# Altium PCB Electrode_35x25_4x5_D2_GUARD.PcbDoc
Units mm, origin at the board's own origin, x right, y up, seen from the top; angles counter-clockwise.
Board outline 35 x 25 mm, 2 copper layers (Top Layer, Bottom Layer); 7 components, 6 nets, 36 pads, 8 vias.
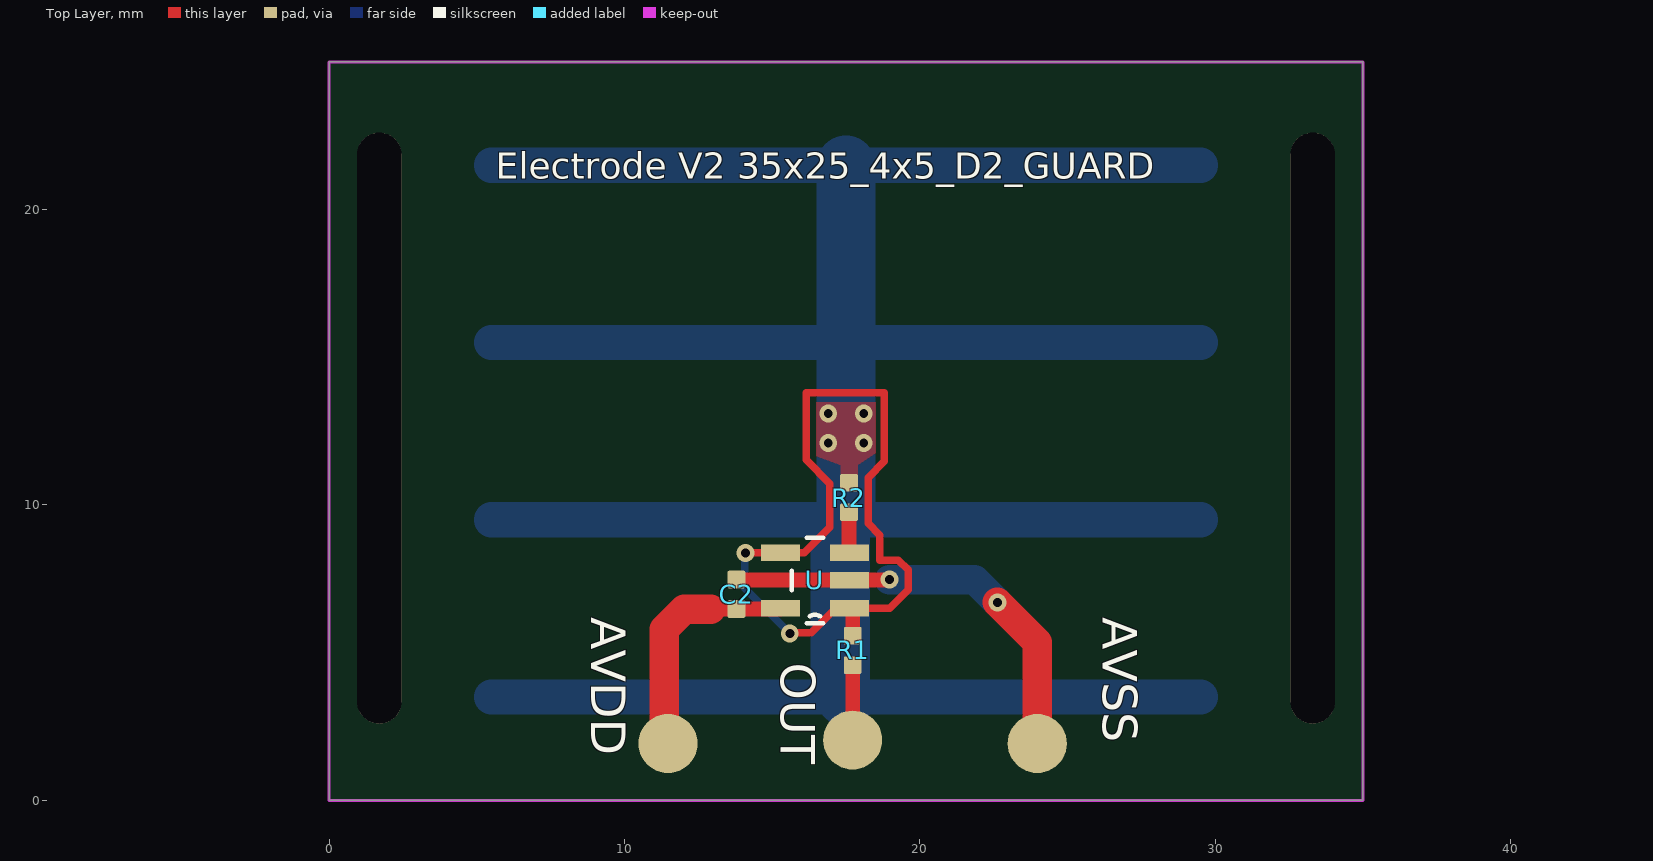
[diagram p0: Top Layer view]
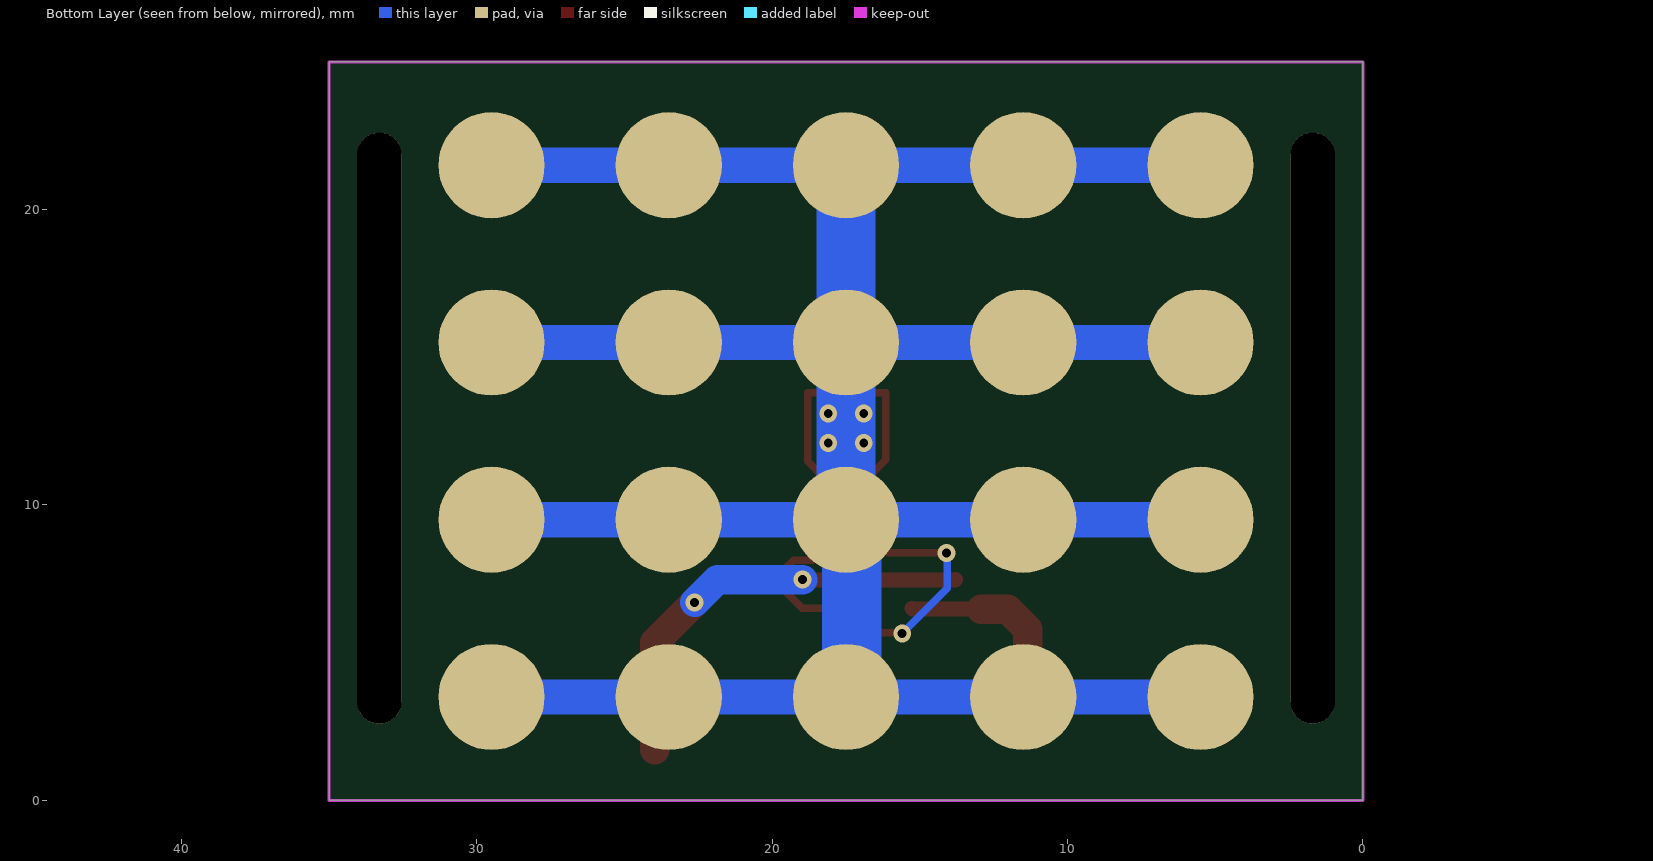
[diagram p1: Bottom Layer view, seen from below]
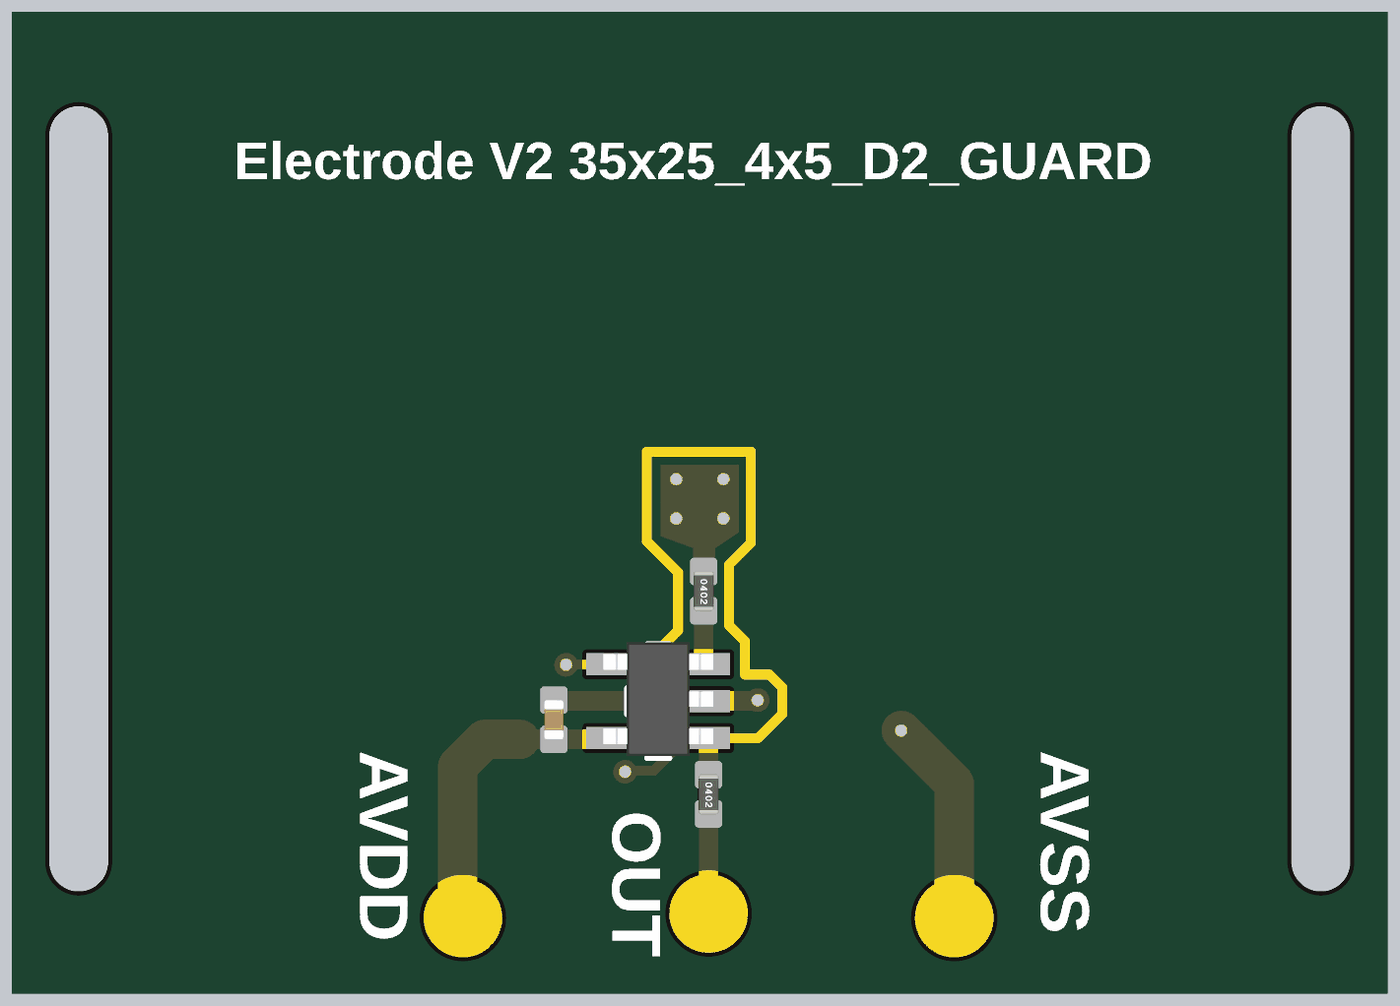
[diagram p2: 3D render of the assembled board from above, using the file's embedded part models]

## Layer stack, top to bottom
Top Solder: solder mask 0.0102, Solder Resist, Dk 3.5
Top Layer: signal copper 0.0356
Dielectric 1: dielectric 0.32, FR-4, Dk 4.8
Bottom Layer: signal copper 0.0356
Bottom Solder: solder mask 0.0102, Solder Resist, Dk 3.5

## Board outline
0,0 0,25 35,25 35,0

## Design rules (kind name [scope] priority, off if disabled: settings)
Clearance [All] p1: gap=0.15 ignorepadtopadclearanceinfootprint=FALSE
HoleSize [All] p1: absolutevalues=TRUE maxlimit=20 minlimit=0.025 maxpercent=80.000 minpercent=20.000
PolygonConnect [All] p1: connectstyle=Direct reliefconductorwidth=0.254 reliefentries=4 polygonreliefangle="90 Angle" airgapwidth=0.254
RoutingVias [All] p1: holewidth=0.711 width=1.27 viastyle="Through Hole" minholewidth=0.3 minwidth=0.6 maxholewidth=0.711 maxwidth=1.27
SolderMaskExpansion [All] p1: expansion=0.102 istentingtop=FALSE
SupplyNets "Schematic Supply Nets_1" [InNet('AVSS')] p1: voltage=0.000
SupplyNets "Schematic Supply Nets" [InNet('AVDD')] p2: voltage=0.000
Width [All] p1: maxlimit=2 minlimit=0.254 preferedwidth=0.254
29 further rules are at their usual default settings.

## Components (designator, comment, footprint, x,y, rotation, side; value= is the part's Value field where it differs from the comment)
AVDD "AVDD" "TESTPOINT 1.2MM"#1 14.147,1.825 r0 top (schematic designator TP1)
AVSS "AVSS" "TESTPOINT 1.2MM"#2 27.247,2.125 r0 top (schematic designator TP3)
C2 "" C0402L 13.79,6.975 r90 top
OUT "OUT" "TESTPOINT 1.2MM"#3 18.368,2.092 r0 top (schematic designator TP2)
R1 "100R" R0402L 17.725,5.075 r270 top
R2 "56K" R0402L 17.6,10.25 r270 top
U "AD8603AUJZ-R2" SOT95P280X100-5N 16.444,7.446 r180 top

## Footprints (in the part's own frame and the unit in brackets; to place one, negate y for a bottom-side part, rotate by r counter-clockwise, add the part's x,y. Pads: shape width x height; smd on the part's side, far side on the other; paste and mask are expansions set on the pad)
C0402L [mm]
  rrect20% 0.6x0.6 smd paste+0.05 mask+0.05: 1(-0.5,0) 2(0.5,0)
  body extent -0.5,-0.25 0.5,0.25, height 0.49
R0402L [mm]
  rrect20% 0.6x0.6 smd paste+0.05 mask+0.05: 1(-0.5,0) 2(0.5,0)
  body extent -0.51,-0.25 0.51,0.25, height 0.51
SOT95P280X100-5N [mil]
  rect 52x22 smd: 1(-46,37) 2(-46,0) 3(-46,-37) 4(46,-37) 5(46,37)
  silkscreen extent -11,-57 31,57, body extent -55,-59 55,55, height 39
"TESTPOINT 1.2MM"#1 [mm]
  round 2 smd paste-1 mask+0.1: 1(-2.672,0.1)
"TESTPOINT 1.2MM"#2 [mm]
  round 2 smd paste-1 mask+0.1: 1(-3.272,-0.2)
"TESTPOINT 1.2MM"#3 [mm]
  round 2 smd paste-1 mask+0.1: 1(-0.643,-0.05)

## Part data
AVDD AVSS OUT: library part "Test point", "Test point", Value1=N/A, Value2=N/A
C2: library part C0402_1, "CAP 0402 100nF 16V Y5V", MPN=CL05B104KO5NNNC, Value1=100nF, Value2=16V, Comment Description="Cap 0.1uF 16V 0402", Manu="Samsung Electro-Mechanics", Type=Capacitor
R1 R2: library part R0402_4_1, Case=0603, MPN="FRC0603J2R0 TS", Value1=2R, Value2=100mW, Comment Description="2Ω ±5% 100mW 0603 Thick Film Resistor", Manu=FOJAN, Type=Resistor
U: "General Purpose Amplifier 1 Circuit Rail-to-Rail TSOT-5", Package="TSOT-5 Analog Devices", Availability=Unavailable, MF="Analog Devices", MP=AD8603AUJZ-R2, Price=None, SnapEDA_Link=https://www.snapeda.com/parts/AD8603AUJZ-R2/Analog%20Devices/view-part/574456/?ref=snap

## Free pads (board coordinates)
  round 3.6 smd far side paste-2539.97: 1(5.5,3.5) 1(5.5,9.5) 1(5.5,15.5) 1(5.5,21.5) 15(11.5,3.5) 15(11.5,9.5) 15(11.5,15.5) 15(11.5,21.5) 16(17.5,3.5) 16(17.5,9.5) 16(17.5,15.5) 16(17.5,21.5) 17(23.5,3.5) 17(23.5,9.5) 17(23.5,15.5) 17(23.5,21.5) 18(29.5,3.5) 18(29.5,9.5) 18(29.5,15.5) 18(29.5,21.5)
  oval 1.5x20 hole 1.5 slot 20 at 90 deg unplated paste-2539.97: 20(1.7,12.6) 20(33.3,12.6)

## Via types
v1: diameter 0.6, hole 0.3, Top Layer to Bottom Layer, tented both sides, 8 vias

## Nets (pads, with @x,y where several pads share a name; then routed paths per layer and width w, separated by ;. In a path a pad name is that pad's centre, name@x,y a point inside that pad or via, vN(x,y) a via of type N, cw(c..) or ccw(c..) an arc to the next point about the centre after c; other vN are vias at no path point)
AVDD: AVDD.1 C2.1 U.5 | length 7
  Top Layer w0.5: 13.225,6.475 C2.1 15.245,6.475 U.5
  Top Layer w1: AVDD.1@11.34,2.746 11.34,5.79 12.025,6.475 12.925,6.475
AVSS: AVSS.1 C2.2 U.2 | length 14.7
  Top Layer w0.5: C2.2 13.805,7.461 17.598,7.461 U.2 17.627,7.461 18.959,7.461 v1(18.973,7.475)
  Top Layer w1: v1(22.625,6.7) 23.975,5.35 AVSS.1@23.975,1.717
  Bottom Layer w1: v1(18.973,7.475) 21.85,7.475 v1(22.625,6.7)
NetR1_1: R1.1 U.1 U.4 | length 27.5
  Top Layer w0.254: v1(14.1,8.375) 14.111,8.386 U.4 16.086,8.386 16.95,9.25 16.95,10.725 16.15,11.525 16.15,13.8 18.8,13.8 18.8,11.475 18.25,10.925 18.25,9.375 18.65,8.975 18.65,8.125 19.275,8.125 19.6,7.8 19.6,7.125 18.981,6.506 U.1 17.156,6.506 16.325,5.675 v1@15.6,5.675
  Top Layer w0.5: U.1 17.725,6.394 R1.1
  Bottom Layer w0.254: v1@14.075,8.375 14.075,7.175 v1(15.6,5.65)
NetR2_2: R2.2 U.3 | length 1.4
  Top Layer w0.5: R2.2 17.6,8.399 U.3
POGO_RAW: pad.1 pad.15 pad.16 pad.17 pad.18 R2.1 | length 114.2
  Bottom Layer w1.2: pad.1@5.5,3.5 11.5,3.5 17.5,3.5 23.5,3.5 pad.18@29.5,3.5 ; pad.1@5.5,9.5 11.5,9.5 17.5,9.5 23.5,9.5 pad.18@29.5,9.5 ; pad.1@5.5,15.5 11.5,15.5 17.5,15.5 23.5,15.5 pad.18@29.5,15.5 ; pad.1@5.5,21.5 11.5,21.5 17.5,21.5 23.5,21.5 pad.18@29.5,21.5
  Bottom Layer w2: pad.16@17.5,3.5 17.304,3.696 17.304,9.304 17.5,9.5 17.5,15.5 pad.16@17.5,21.5
  other v1: 16.9,12.1 18.1,12.1 16.9,13.1 18.1,13.1
SIGNAL_OUT: OUT.1 R1.2 | length 1.7
  Top Layer w0.5: OUT.1 OUT.1@17.76,2.077 ; OUT.1@17.725,2.898 R1.2

## Polygon pours and split planes (outlines as drawn)
POGO_RAW on Top Layer "POGO_RAW_L01_P001" (solid, remove dead copper, pour order 1): 16.5,13.475 18.5,13.475 18.5,11.75 17.9,11.35 17.9,10.95 17.3,10.95 17.325,10.975 17.325,11.35 16.5,11.65

## Keep-outs
Keep-Out Layer:
  the board outline again, w0.1

## Silkscreen, mask and mechanical layers (free items; w line width, h text height)
Top Overlay:
  text "Electrode V2 35x25_4x5_D2_GUARD" at 5.65,20.744 h1.52
Top Solder:
  lines w0.254: 17.65,4.8 17.675,4.775
  lines w0.5: 17.65,4.8 17.695,4.845 17.695,5.63 17.675,5.65
Bottom Solder:
  lines w0.254: 15.253,4.922 15.375,4.8